# Altium PCB PCB_Rotaryswitch-v1.0.PcbDoc
Units mil, origin at the board's own origin, x right, y up, seen from the top; angles counter-clockwise.
Board outline 522.02 x 522.02 mil, 2 copper layers (Top Layer, Bottom Layer), stack 61.811 mil thick; 9 components, 7 nets, 18 pads, 0 vias.
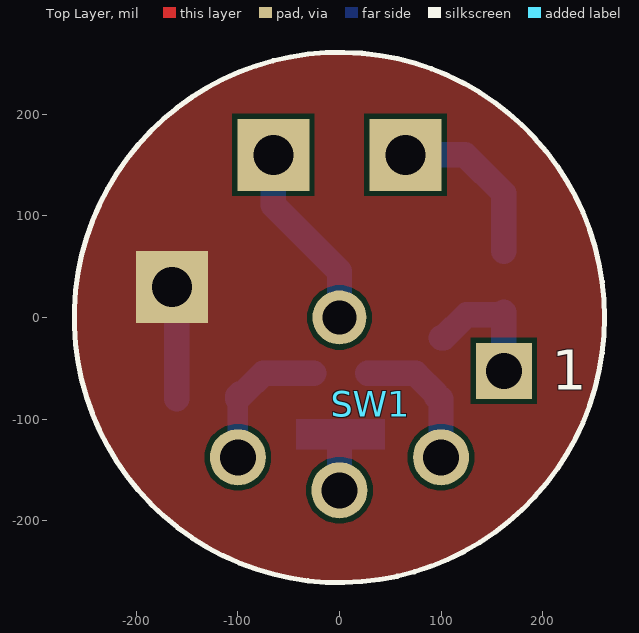
[diagram p0: Top Layer view]
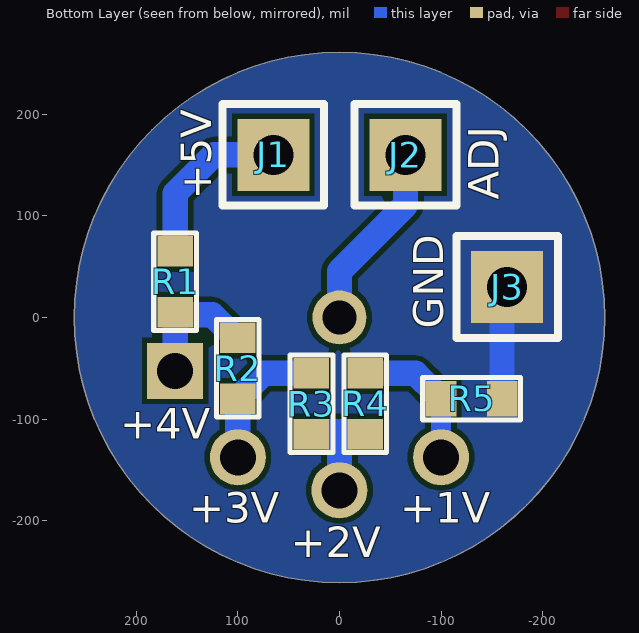
[diagram p1: Bottom Layer view, seen from below]
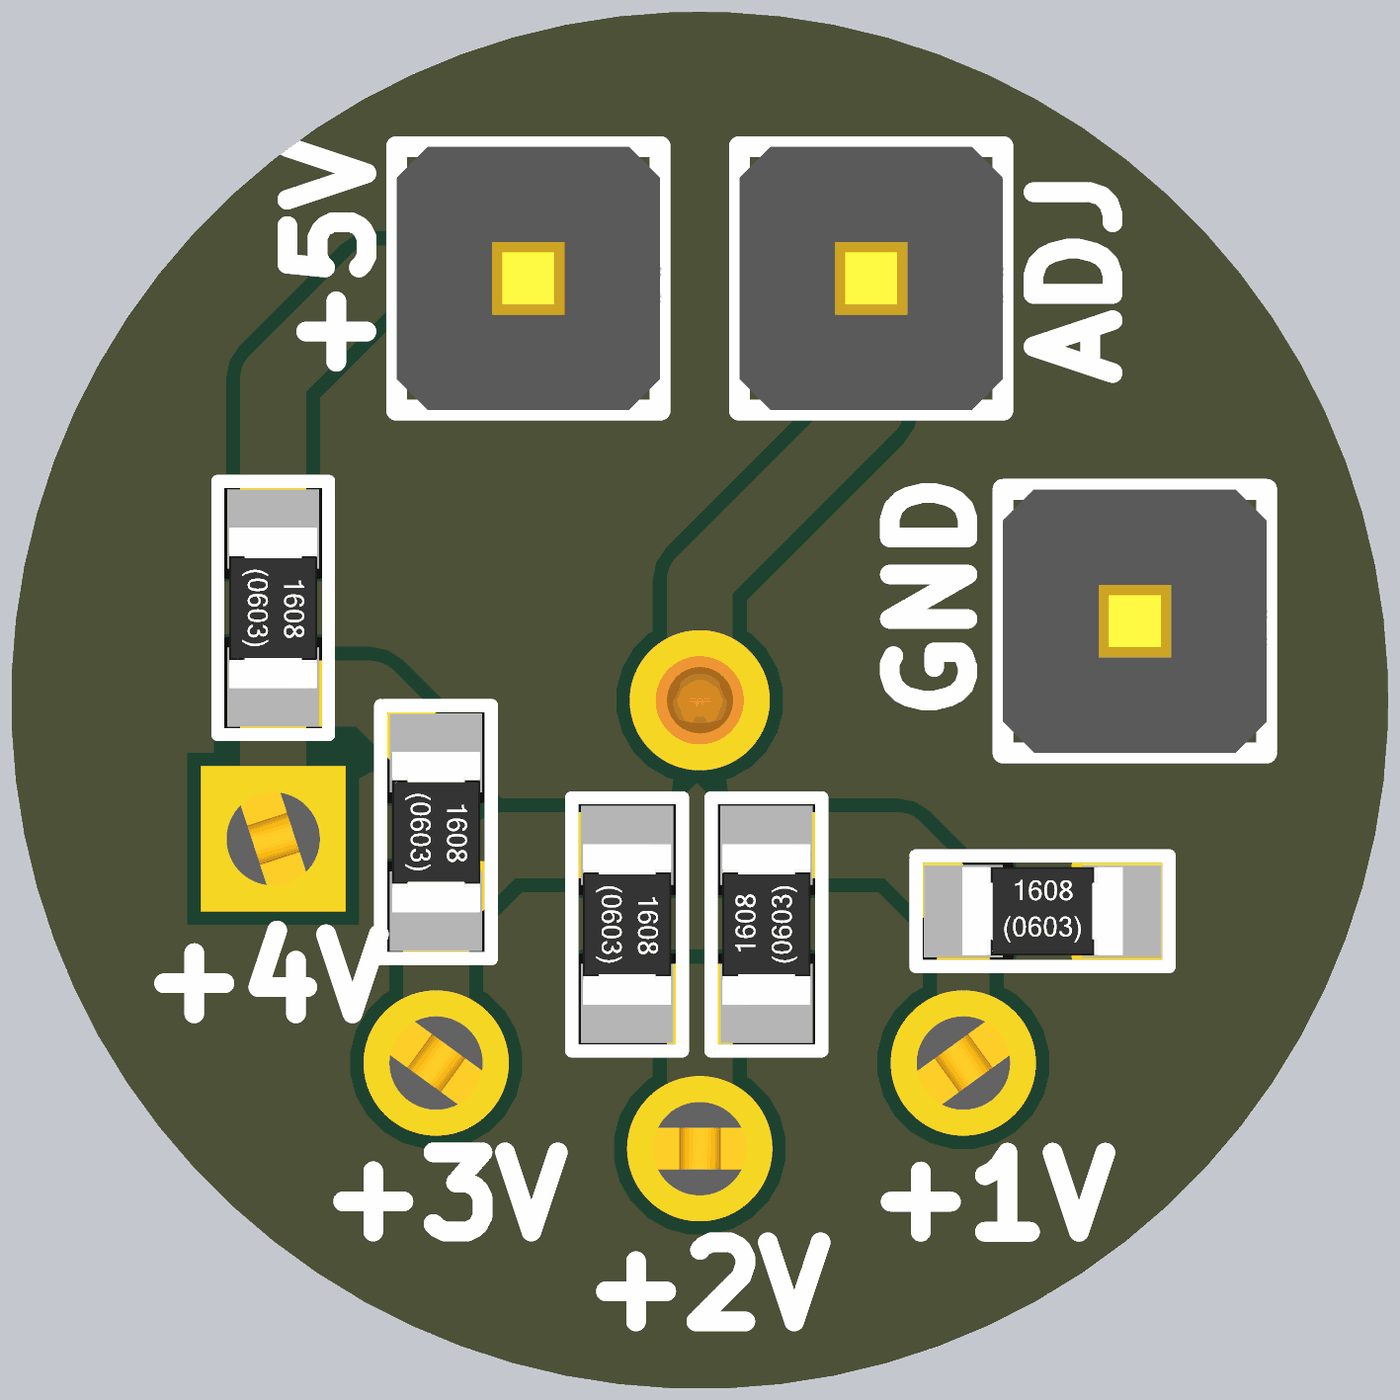
[diagram p2: 3D render of the assembled board from below, using the file's embedded part models]

## Layer stack, top to bottom
Top Solder: solder mask 0.3937, Solder Resist, Dk 3.5
Top Layer: signal copper 1.378
Dielectric 1: dielectric 59.0551, FR-4, Dk 4.8
Bottom Layer: signal copper 1.378
Bottom Solder: solder mask 0.3937, Solder Resist, Dk 3.5

## Board outline
-261.01,0 ccw(c0,0) 0,-261.01 ccw(c0,0) 261.01,0 ccw(c0,0) 0,261.01 ccw(c0,0)

## Design rules (kind name [scope] priority, off if disabled: settings)
Clearance [All] p1: gap=5 ignorepadtopadclearanceinfootprint=FALSE
ComponentClearance [All] p1: gap=0 collisioncheckmode=3 verticalgap=0 showdistances=FALSE
Height [All] p1: minheight=0 maxheight=1968.5 prefheight=500
MinimumSolderMaskSliver [All] p1: minsoldermaskwidth=0
PolygonConnect [All] p1: connectstyle=Direct reliefconductorwidth=10 reliefentries=4 polygonreliefangle="90 Angle" airgapwidth=10
RoutingVias [All] p1: holewidth=28 width=50 viastyle="Through Hole" minholewidth=28 minwidth=50 maxholewidth=28 maxwidth=50
SilkToSilkClearance [All] p1: silktosilkclearance=2
SilkToSolderMaskClearance [IsPad] p1: minsilkscreentomaskgap=0 clearancetoexposedcopper=TRUE
SolderMaskExpansion [All] p1: expansion=4 istentingtop=FALSE
UnRoutedNet [All] p1: checkbadconnections=TRUE
Width [All] p1: maxlimit=25 minlimit=10 preferedwidth=12 minimp=50.000000 maximp=50.000000 favimp=50.000000
24 further rules are at their usual default settings.

## Components (designator, comment, footprint, x,y, rotation, side; value= is the part's Value field where it differs from the comment)
J1 "X6511WV-01H-C60D30" "HDR 1x1 TH Male" 65,160 r180 bottom locked
J2 "X6511WV-01H-C60D30" "HDR 1x1 TH Male" -65,160 r180 bottom locked
J3 "X6511WV-01H-C60D30" "HDR 1x1 TH Male" -165,30 r180 bottom locked
R1 "1K" Res-0603 161.77,35 r90 bottom locked
R2 "1K" Res-0603 100,-50 r90 bottom locked
R3 "1K" Res-0603 27.56,-85 r90 bottom locked
R4 "1K" Res-0603 -25.28,-85 r270 bottom locked
R5 "1K" Res-0603 -130,-80 r0 bottom
SW1 "56DP36-01-1-AJS" 56DP36-01-1-AJS 0,0 r0 top locked

## Footprints (in the part's own frame and the unit in brackets; to place one, negate y for a bottom-side part, rotate by r counter-clockwise, add the part's x,y. Pads: shape width x height; smd on the part's side, far side on the other; paste and mask are expansions set on the pad)
56DP36-01-1-AJS [mm]
  rect 1.4x1.4 hole 0.9 paste-1000 mask+0: 1(4.109,-1.335)
  round 1.4 hole 0.9 paste-1000 mask+0: 2(2.539,-3.495) 3(0,-4.32) 4(-2.539,-3.495)
  round 1.35 hole 0.85 paste-1000 mask+0: 11(0,0)
  silkscreen extent -6.63,-6.63 6.63,6.63, body extent -6.35,-6.36 6.35,6.36, height 26.9
"HDR 1x1 TH Male" [mm]
  rect 1.8x1.8 hole 1: 1(0,0)
  silkscreen extent -1.27,-1.27 1.27,1.27, body extent -1.27,-1.27 1.28,1.27, height 8.5
Res-0603 [mil]
  rect 30x35 smd: 1(-30,0) 2(30,0)
  silkscreen extent -48,-21 48,21, body extent -31,-17 31,17, height 18

## Part data
J1 J2 J3: "Gold 250V 3A Square Pins 2.5mm 1P 260℃ 6mm -40℃~+105℃ 3mm 2.54mm Brass Black Plugin 2.54mm 1x1P Plugin,P=2.54mm Pin Headers ROHS", LCSC Part Number=C5242194, Manufacturer=XKB, Package=Plugin,P=2.54mm, ComponentLink1Description=LCSC, ComponentLink1URL=https://www.lcsc.com/product-detail/Pin-Headers_XKB-Connection-X6511WV-01H-C60D30_C5242194.html, Item Type="Male Header", Manufacturer Part Number=X6511WV-01H-C60D30
R1 R2 R3 R4 R5: library part RT0603BRD071KL, "RES SMD 1K OHM 0.1% 1/10W 0603", Case Code (Imperial)=0603, Case Code (Metric)=1608, LCSC Part Number=C110776, Manufacturer=Yageo, Max Operating Temperature=125°C, Max Power Dissipation=100mW, Min Operating Temperature=-55°C, Package Quantity=5000, Resistance=1kR, Resistor Type="Thin Film", Temperature Coefficient=25ppm/°C, Voltage Rating=75V, Voltage Rating (DC)=50V, Case/Package=0603, Category="Chip SMD Resistors", ComponentLink1Description=https://datasheet.ciiva.com/11819/0900766b8079c86e-11819652.pdf?src-supplier=RSComponents, ComponentLink1URL=https://datasheet.ciiva.com/11819/0900766b8079c86e-11819652.pdf?src-supplier=RSComponents, ComponentLink2Description=https://datasheet.ciiva.com/5624/pyu-rt-1-to-0-05-rohs-l-4-5624759.pdf?src-supplier=Mouser, ComponentLink2URL=https://datasheet.ciiva.com/5624/pyu-rt-1-to-0-05-rohs-l-4-5624759.pdf?src-supplier=Mouser, ComponentLink3Description=https://datasheet.ciiva.com/29718/pyu-rt-1-to-0-05-rohs-l-4-29718010.pdf?src-supplier=Digi-Key, ComponentLink3URL=https://datasheet.ciiva.com/29718/pyu-rt-1-to-0-05-rohs-l-4-29718010.pdf?src-supplier=Digi-Key, ComponentLink4Description=https://datasheet.ciiva.com/29718/pyu-rt-1-to-0-05-rohs-l-4-29718011.pdf?src-supplier=Digi-Key, ComponentLink4URL=https://datasheet.ciiva.com/29718/pyu-rt-1-to-0-05-rohs-l-4-29718011.pdf?src-supplier=Digi-Key, Construction=Rectangular, Contact Plating=Tin,Lead, Depth=0.8mm, Features="Moisture Resistant", Height=0.022inch, Item Type=Resistor, Lead Free="Lead Free", Length=1.6mm, Manufacturer Part Number=RT0603BRD071KL, Military Standard=Not, Mount="Surface Mount", Number of Terminations=2, Packaging="Tape and Reel", Power Rating=100mW, Pricing 1="5000=0.03900, 10000=0.03450, 25000=0.03070, 50000=0.02040 (USD)", RoHS=Yes, RoHS Compliant=Yes, Series=RT, Size Code=0603, Stock 1=130000, Supplier 1="Arrow Electronics", Supplier Part Number 1=RT0603BRD071KL, Technology="THIN FILM", Termination=SMD/SMT, Width=0.031inch
SW1: "2 - 10 positions 36deg Rotary Switch; 115 V ac; 30 V dc; 200 mA; Shaft", Manufacturer=Grayhill, Supplier Part Number=56DP36-01-1-AJS-ND, ComponentLink1Description=https://datasheet.ciiva.com/2887/rotary-56-2887598.pdf?src-supplier=Digikey, ComponentLink1URL=https://datasheet.ciiva.com/2887/rotary-56-2887598.pdf?src-supplier=Digikey, Item Type="Rotary Switches", Manufacturer Part Number=56DP36-01-1-AJS, Pricing="1=24.84, 5=21.334, 10=19.997, 25=18.3256, 50=17.156, 100=16.0977, 250=14.76088, 500=14.4824 (USD)", RoHS=Yes, Supplier=Digikey

## Nets (pads, with @x,y where several pads share a name; then routed paths per layer and width w, separated by ;. In a path a pad name is that pad's centre, name@x,y a point inside that pad or via, vN(x,y) a via of type N, cw(c..) or ccw(c..) an arc to the next point about the centre after c; other vN are vias at no path point)
+1V: R4.1 R5.2 SW1.4 | length 144.1
  Bottom Layer w20: SW1.4 R5.2
  Bottom Layer w25: R5.2 -100,-77.5 -97.5,-75 -95,-75 -75,-55 R4.1
+2V: R3.1 R4.2 SW1.3 | length 110.9
  Bottom Layer w10: R4.2 7.22,-115 ; 0,-122.22 7.22,-115 ; R3.1 7.22,-115
  Bottom Layer w25: SW1.3 0,-122.22
+3V: R2.1 R3.2 SW1.2 | length 141.8
  Bottom Layer w25: R3.2 74.94,-55 95,-75.06 95,-77.5 97.53,-80.03 R2.1 SW1.2
+4V: R1.1 R2.2 SW1.1 | length 129.7
  Bottom Layer w25: R2.2 102.5,-20 125,2.5 159.27,2.5 R1.1 SW1.1
+5V: J1.1 R1.2 | length 168.8
  Bottom Layer w25: J1.1 123.83,160 161.77,122.07 R1.2@161.77,75.73 ; R1.2 R1.2@161.77,75
GND: J3.1 R5.1 | length 111.3
  Bottom Layer w25: J3.1 cw(c-177.07,17.93) -160,17.93 R5.1
NetJ2_1: J2.1 SW1.11 | length 186.9
  Bottom Layer w25: J2.1 -65,110.43 0,45.44 SW1.11

## Polygon pours and split planes (outlines as drawn)
GND on Bottom Layer "NONET_L-01_P-001" (solid, remove dead copper, pour order 1): -261.01,0 ccw(c0,0) 0,-261.01 ccw(c0,0) 261.01,0 ccw(c0,0) 0,261.01 ccw(c0,0)
GND on Top Layer "NONET_L-01_P-001" (solid, remove dead copper, pour order 0): -261.01,0 ccw(c0,0) 0,-261.01 ccw(c0,0) 261.01,0 ccw(c0,0) 0,261.01 ccw(c0,0)

## Other copper
Bottom Layer:
  rectangle net +2V: -42.78,-130 45.06,-100

## Silkscreen, mask and mechanical layers (free items; w line width, h text height)
Bottom Overlay:
  text "ADJ" at -157,116 h30 r270
  text "+5V" at 126,116 h30 r270
  text "GND" at -102,-11 h29.53 r270
  text "+4V" at 215.54,-119.18 h30
  text "+1V" at -60,-202 h30
  text "+3V" at 147.67,-201.9 h30
  text "+2V" at 48,-236 h30
Board Outline:
  circle w10: c0,0 r261.01
Fabrication:
  drawing of 191 lines, arcs and shapes, not listed
  text "Layer" at 440.34,-212 h60
  text "Name" at 850.26,-212 h60
  text "Material" at 1780,-212 h60
  text "Thickness" at 2639.77,-212 h60
  text "Constant" at 3289.6,-212 h60
  text "Board Layer Stack" at 3859.46,-212 h60
  text "Top Overlay" at 850.26,-332 h60
  text "Top Solder" at 850.26,-452 h60
  text "Solder Resist" at 1780,-452 h60
  text "0.39mil" at 2639.77,-452 h60
  text "3.5" at 3289.6,-452 h60
  text "1" at 440.34,-572 h60
  text "Top Layer" at 850.26,-572 h60
  text "1.38mil" at 2639.77,-572 h60
  text "Dielectric 1" at 850.26,-692 h60
  text "FR-4" at 1780,-692 h60
  text "59.06mil" at 2639.77,-692 h60
  text "4.8" at 3289.6,-692 h60
  text "2" at 440.34,-812 h60
  text "Bottom Layer" at 850.26,-812 h60
  text "1.38mil" at 2639.77,-812 h60
  text "Bottom Solder" at 850.26,-932 h60
  text "Solder Resist" at 1780,-932 h60
  text "0.39mil" at 2639.77,-932 h60
  text "3.5" at 3289.6,-932 h60
  text "Bottom Overlay" at 850.26,-1052 h60
  text "Total board thickness:" at 440.34,-1172 h60
  text "62.60mil" at 2639.77,-1172 h60
Drill Drawing:
  circle w10: c455.69,664.33 r33.33
  lines w10: 422.36,397.67 489.02,397.67 455.69,331 422.36,397.67 ; 422.36,481 489.02,481 489.02,547.67 422.36,547.67 422.36,481
  lines w15: 362.56,286 11059.59,286 ; 362.56,736 11059.59,736 ; 913.44,136 913.44,886 ; 1393.32,136 1393.32,886 ; 2493,136 2493,886 ; 2998.88,136 2998.88,886 ; 3732.68,136 3732.68,886 ; 5232.23,136 5232.23,886 ; 5822.08,136 5822.08,886 ; 6567.88,136 6567.88,886 ; 7457.62,136 7457.62,886 ; 8791.23,136 8791.23,886 ; 9656.99,136 9656.99,886 ; 362.56,136 11059.59,136 11059.59,886 362.56,886 362.56,136
  text "Symbol" at 452.56,781 h72
  text "Count" at 958.44,781 h72
  text "Hole Size" at 1438.32,781 h72
  text "Plated" at 2538,781 h72
  text "Hole Type" at 3043.88,781 h72
  text "Drill Layer Pair" at 3777.68,781 h72
  text "Via/Pad" at 5277.23,781 h72
  text "Pad Shape" at 5867.08,781 h72
  text "Template" at 6612.88,781 h72
  text "Hole Tolerance (-)" at 7502.62,781 h72
  text "Hole Length" at 8836.23,781 h72
  text "Routed Path Length" at 9701.99,781 h72
  text "1" at 958.44,631 h60
  text "33.47mil (0.850mm)" at 1438.32,631 h60
  text "PTH" at 2538,631 h60
  text "Round" at 3043.88,631 h60
  text "Top Layer - Bottom Layer" at 3777.68,631 h60
  text "Pad" at 5277.23,631 h60
  text "Rounded" at 5867.08,631 h60
  text "c135h85m135p-1" at 6612.88,631 h60
  text "-" at 8836.23,631 h60
  text "-" at 9701.99,631 h60
  text "4" at 958.44,481 h60
  text "35.43mil (0.900mm)" at 1438.32,481 h60
  text "PTH" at 2538,481 h60
  text "Round" at 3043.88,481 h60
  text "Top Layer - Bottom Layer" at 3777.68,481 h60
  text "Pad" at 5277.23,481 h60
  text "(Mixed)" at 5867.08,481 h60
  text "(Mixed)" at 6612.88,481 h60
  text "-" at 8836.23,481 h60
  text "-" at 9701.99,481 h60
  text "3" at 958.44,331 h60
  text "39.37mil (1.000mm)" at 1438.32,331 h60
  text "PTH" at 2538,331 h60
  text "Round" at 3043.88,331 h60
  text "Top Layer - Bottom Layer" at 3777.68,331 h60
  text "Pad" at 5277.23,331 h60
  text "Rectangle" at 5867.08,331 h60
  text "s180h100" at 6612.88,331 h60
  text "-" at 8836.23,331 h60
  text "-" at 9701.99,331 h60
  text "8 Total" at 958.44,181 h60

## Text inside footprints (layer, text, board x,y; h text height)
SW1: Top Overlay "1" at 208.87,-71.13 h39.37